# Altium PCB Afrodite V10_Final_3K (2).PcbDoc
Units mil, origin at the board's own origin, x right, y up, seen from the top; angles counter-clockwise.
Board outline 2992.52 x 4047.48 mil, 2 copper layers (Top Layer, Bottom Layer); 43 components, 30 nets, 158 pads, 7 vias.
Unrouted connection lines stored in the file: 2.
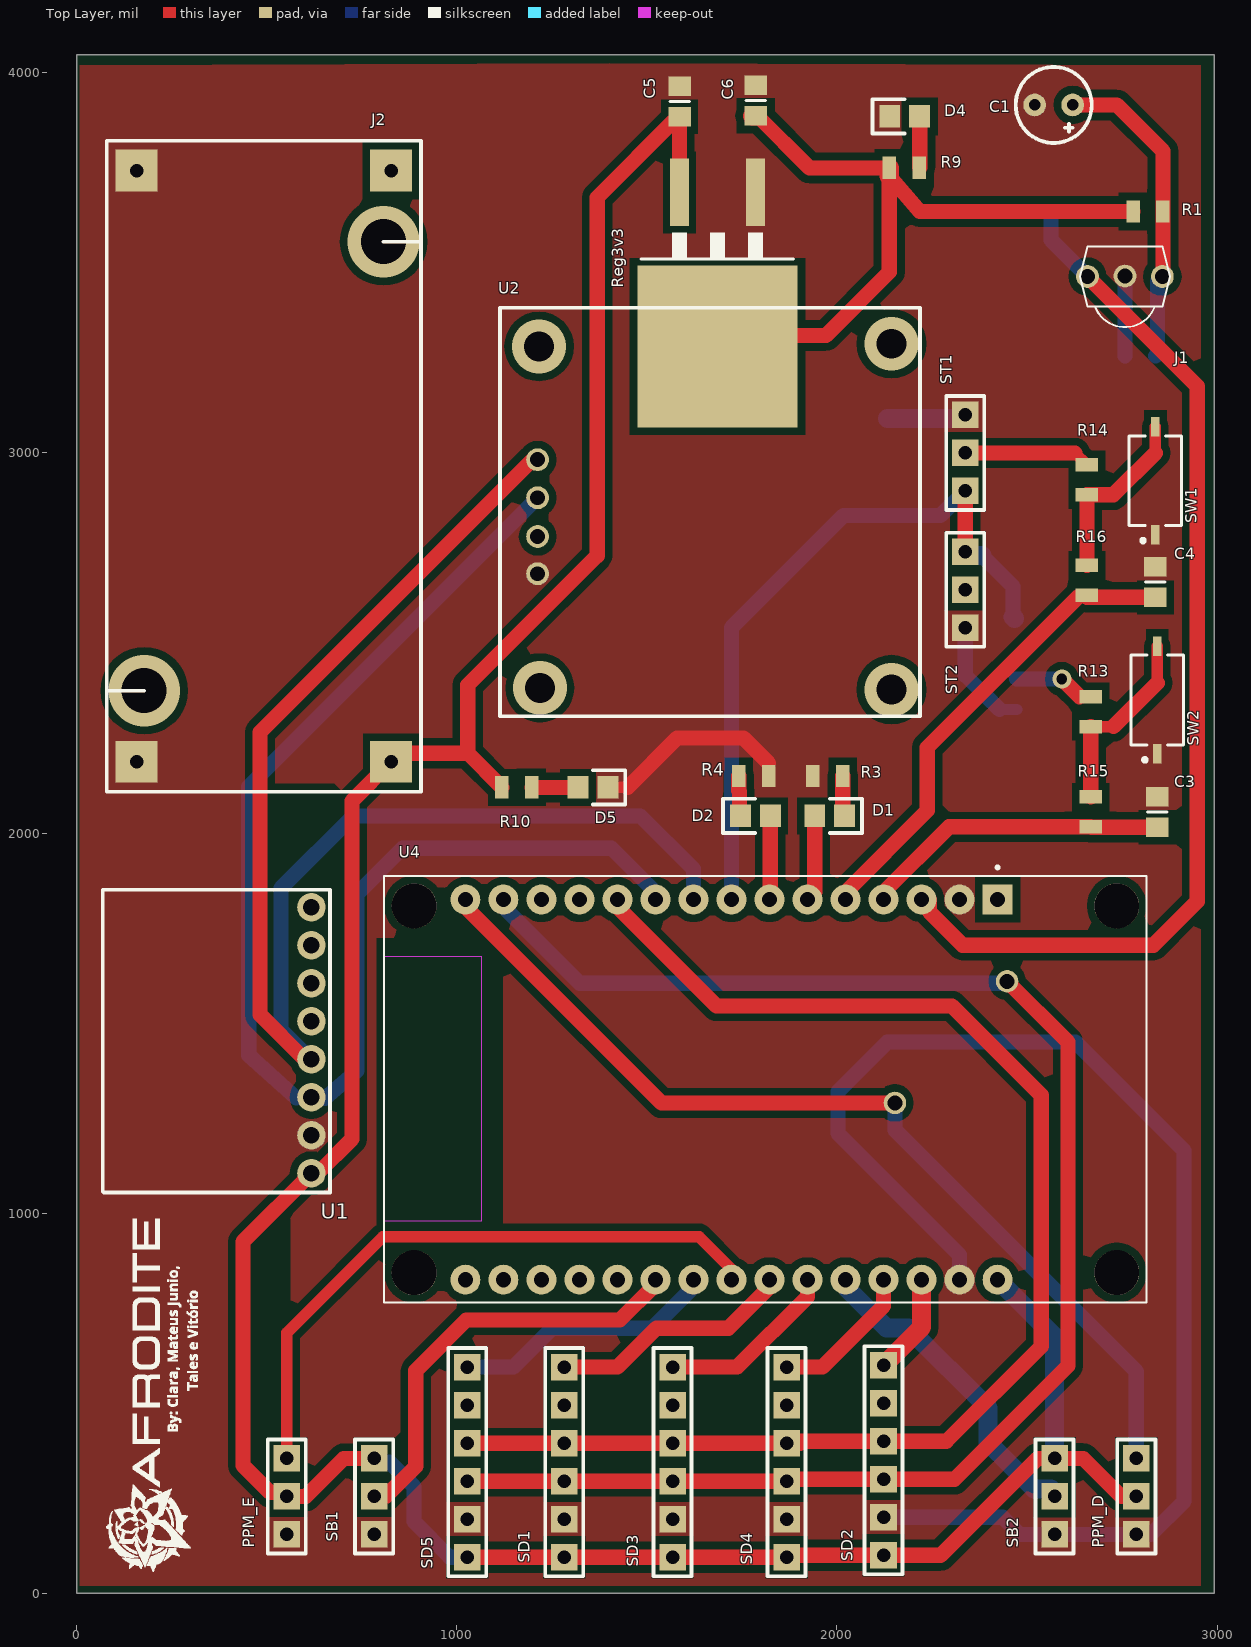
[diagram p0: Top Layer view]
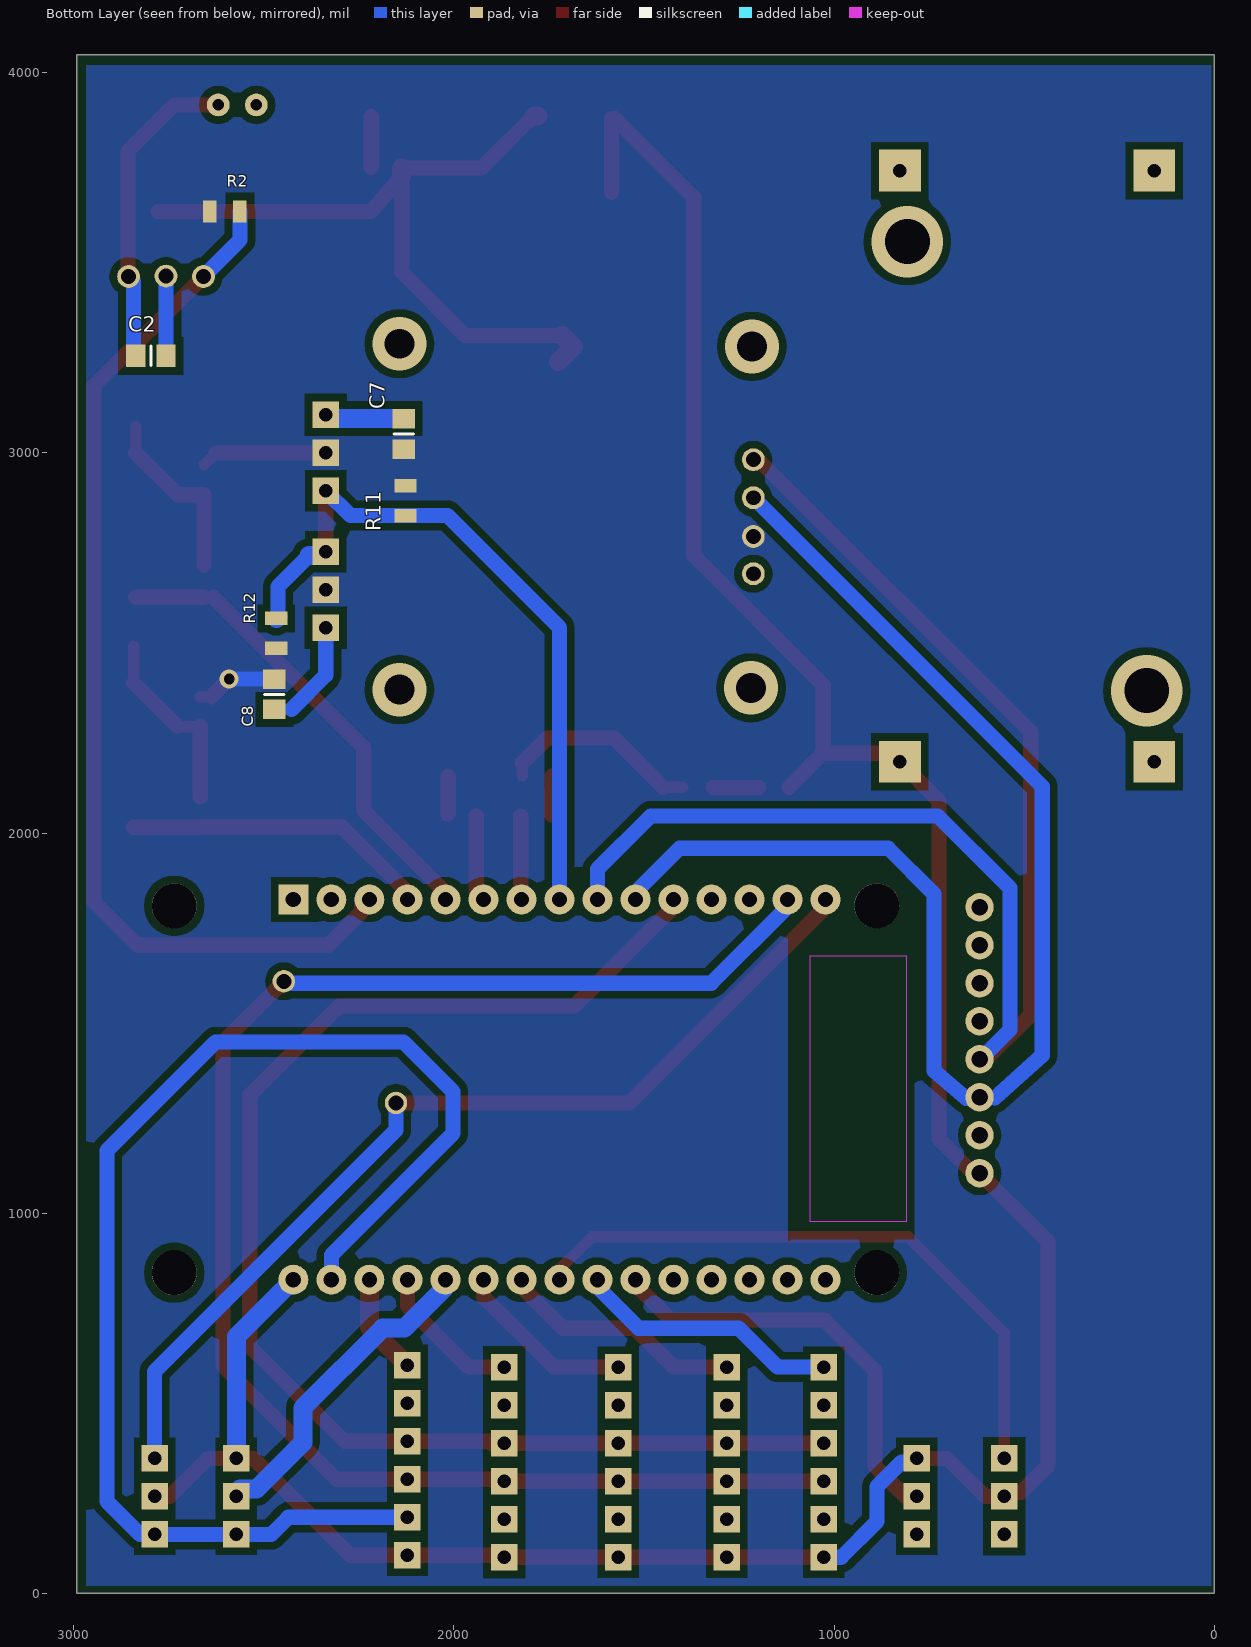
[diagram p1: Bottom Layer view, seen from below]

## Layer stack, top to bottom
Top Solder: solder mask 0.4, Solder Resist, Dk 3.5
Top Layer: signal copper 1.4
Dielectric 1: dielectric 12.6, FR-4, Dk 4.8
Bottom Layer: signal copper 1.4
Bottom Solder: solder mask 0.4, Solder Resist, Dk 3.5

## Board outline
0,0 0,4047.48 2992.52,4047.48 2992.52,0

## Design rules (kind name [scope] priority, off if disabled: settings)
Clearance [All] p1: gap=20 ignorepadtopadclearanceinfootprint=FALSE
PlaneConnect [All] p1: planeconnectstyle=Direct reliefexpansion=20 reliefentries=4 reliefconductorwidth=10 reliefairgap=10
PolygonConnect [All] p1: connectstyle=Direct reliefconductorwidth=10 reliefentries=4 polygonreliefangle="90 Angle" airgapwidth=10
RoutingVias [All] p1: holewidth=28 width=50 viastyle="Through Hole" minholewidth=28 minwidth=50 maxholewidth=28 maxwidth=50
SolderMaskExpansion [All] p1: expansion=4
Width [All] p1: maxlimit=50 minlimit=20 preferedwidth=30
29 further rules are at their usual default settings.

## Components (designator, comment, footprint, x,y, rotation, side; value= is the part's Value field where it differs from the comment)
C1 "CAP" "CAP ELET .100" 2570.08,3915.35 r0 top
C2 "CAP" "CAP 0805" 2797.52,3255 r0 bottom
C3 "CAP" "CAP 0805" 2842.52,2055 r270 top
C4 "CAP" "CAP 0805" 2837.52,2660 r270 top
C5 "CAP" "CAP 0805" 1585.83,3924.41 r270 top
C6 "CAP" "CAP 0805" 1786.22,3926.77 r270 top
C7 "CAP" "CAP 0805" 2132.52,3050 r90 bottom
C8 "CAP" "CAP 0805" 2472.52,2365 r270 bottom
D1 "LED" "LED 0805" 1980.87,2045 r0 top
D2 "LED" "LED 0805" 1785.24,2045 r180 top
D4 "LED" "LED 0805" 2178.15,3885 r180 top
D5 "LED" "LED 0805" 1358.15,2120 r0 top
J1 "TSOP1838" TSOP18XX 2757.52,3465 r0 top
J2 "Component_1" PCB_LM2596 662.52,2725 r270 top
PPM_D "CONECTOR_3PIN" CON3 2787.52,155 r90 top
PPM_E "CONECTOR_3PIN" CON3 552.52,155 r90 top
R1 "RESISTOR" "RES 0805" 2818.15,3635 r180 top value=100
R2 "RESISTOR" "RES 0805" 2602.52,3635 r0 bottom value=20k
R3 "RESISTOR" "RES 0805" 1975.87,2150 r180 top value=10k
R4 "RESISTOR" "RES 0805" 1780.87,2150 r0 top value=10k
R9 "RESISTOR" "RES 0805" 2176.89,3749.53 r0 top value=10k
R10 "RESISTOR" "RES 0805" 1158.15,2120 r0 top value=10k
R11 "RESISTOR" "RES 0805" 2127.52,2874.37 r270 bottom value=10k
R12 "RESISTOR" "RES 0805" 2467.52,2525 r90 bottom value=10k
R13 "RESISTOR" "RES 0805" 2667.52,2319.37 r90 top value=10k
R14 "RESISTOR" "RES 0805" 2657.52,2929.37 r90 top value=10k
R15 "RESISTOR" "RES 0805" 2667.52,2055.63 r270 top value=100
R16 "RESISTOR" "RES 0805" 2657.52,2665 r270 top value=100
Reg3v3 "g108433" TO263-3 1685.83,3307.48 r180 top (schematic designator g108433)
SB1 "CONECTOR_3PIN" CON3 782.52,155 r90 top
SB2 "CONECTOR_3PIN" CON3 2572.52,155 r90 top
SD1 "CONECTOR_6PIN" CON6 1282.52,595 r270 top
SD2 "CONECTOR_6PIN" CON6 2122.52,600 r270 top
SD3 "CONECTOR_6PIN" CON6 1567.52,595 r270 top
SD4 "CONECTOR_6PIN" CON6 1867.52,595 r270 top
SD5 "CONECTOR_6PIN" CON6 1027.52,595 r270 top
ST1 "CONECTOR_3PIN" CON3 2337.52,3100 r270 top
ST2 "CONECTOR_3PIN" CON3 2337.52,2540 r90 top
SW1 "PushButtonSMD" PUSHBUTTON.SMD 2837.52,2926.73 r90 top
SW2 "PushButtonSMD" PUSHBUTTON.SMD 2842.52,2350 r90 top
U1 "Sensor giroscopio acelerometro" mpu6050 637.52,1105 r180 top value=MPU6050
U2 "Displat OLED 128x64" "Display OLED" 1118.52,2307 r90 top
U4 "ESP32-DEVKIT-V1" MODULE_ESP32_DEVKIT_V1 1811.69,1325 r270 top

## Footprints (in the part's own frame and the unit in brackets; to place one, negate y for a bottom-side part, rotate by r counter-clockwise, add the part's x,y. Pads: shape width x height; smd on the part's side, far side on the other; paste and mask are expansions set on the pad)
"CAP 0805" [mm] "0805"
  rect 1.3x1.5 smd: 1(-1.016,0) 2(1.016,0)
  silkscreen extent 0,-0.65 0,0.65, body extent -1.03,-0.61 0.97,0.59, height 0.88
"CAP ELET .100" [mil]
  round 60 hole 30: 1(-50,0) 2(50,0)
  silkscreen extent -100,-100 100,100, body extent -98,-99 98,98, height 453
CON3 [mil]
  rect 70x70 hole 35.43: 1(0,0) 2(100,0) 3(200,0)
  silkscreen extent -50,-50 250,50, body extent -39,-47 239,46, height 519
CON6 [mil]
  rect 70x70 hole 35.43: 1(0,0) 2(100,0) 3(200,0) 4(300,0) 5(400,0) 6(500,0)
  silkscreen extent -50,-50 550,50, body extent -50,-47 543,46, height 519
"Display OLED" [mil]
  round 60 hole 39.37: 1(375,-94) 2(473,-94) 3(575,-94) 4(675,-94)
  silkscreen extent 0,-1100 1075,5, body extent -265,-1098 1049,-1, height 426
"LED 0805" [mm] "0805"
  rect 1.4x1.5 smd: 1(-1,0) 2(1,0)
  silkscreen extent 0,-1.14 2.16,1.14, body extent -1.03,-0.4 1.03,0.51, height 0.85
MODULE_ESP32_DEVKIT_V1 [mm]
  rect 2x2 hole 1.02: 1(-12.7,15.515)
  round 2 hole 1.02: 2(-12.7,12.975) 3(-12.7,10.435) 4(-12.7,7.895) 5(-12.7,5.355) 6(-12.7,2.815) 7(-12.7,0.275) 8(-12.7,-2.265) 9(-12.7,-4.805) 10(-12.7,-7.345) 11(-12.7,-9.885) 12(-12.7,-12.425) 13(-12.7,-14.965) 14(-12.7,-17.505) 15(-12.7,-20.045) 16(12.7,-20.045) 17(12.7,-17.505) 18(12.7,-14.965) 19(12.7,-12.425) 20(12.7,-9.885) 21(12.7,-7.345) 22(12.7,-4.805) 23(12.7,-2.265) 24(12.7,0.275) 25(12.7,2.815) 26(12.7,5.355) 27(12.7,7.895) 28(12.7,10.435) 29(12.7,12.975) 30(12.7,15.515)
  round 3 hole 3 unplated: ""(-12.28,23.475) ""(-12.28,-23.475) ""(12.23,23.475) ""(12.23,-23.475)
  Keep-Out Layer region: 8.78,-25.475 -8.91,-25.475 -8.91,-18.985 8.78,-18.985
  Keep-Out Layer region: 8.78,-25.475 -8.91,-25.475 -8.91,-18.985 8.78,-18.985
  silkscreen extent -14.95,-25.47 14.23,25.47, body extent -14.22,-25.53 14.28,25.4, height 7.24
mpu6050 [mm]
  round 1.9 hole 1.1: 1(0.508,0) 2(0.508,-2.54) 3(0.508,-5.08) 4(0.508,-7.62) 5(0.508,-10.16) 6(0.508,-12.7) 7(0.508,-15.24) 8(0.508,-17.78)
  silkscreen extent -0.74,-18.95 14.45,1.3, body extent -3.86,-19.02 14.5,1.3, height 36.48
PCB_LM2596 [mm]
  rect 2.8x2.8 hole 0.9: 1(-25.846,4.182) 2(-25.846,-12.818) 3(13.654,4.182) 4(13.654,-12.818)
  silkscreen extent -27.85,-14.82 15.65,6.18, body extent -27.85,-14.82 15.65,6.18, height 13.02
PUSHBUTTON.SMD [mm] "SODFL, 2-Leads, Body 3,40x7,98mm, IPC Medium Density"
  rect 1.3x0.55 smd: 1(-3.6,0) 2(3.6,0)
  silkscreen extent -4.12,-1.75 3,1.75, body extent -3,-1.75 3,1.75, height 2
"RES 0805" [mm] "0805 (1/8W)"
  rect 0.9x1.5 smd: 1(-1,0) 2(1,0)
  body extent -1.02,-0.62 0.95,0.6, height 0.48
TO263-3 [mm]
  rect 1.25x4.5 smd: 1(-2.54,-9.6) 3(2.54,-9.6)
  rect 10.7x10.8 smd: 2(0,0.7)
  silkscreen extent -5.08,-6.88 5.11,-5.15, body extent -5.16,-9.53 4.9,5.71, height 4.84
TSOP18XX [mil]
  round 60 hole 39.37: 1(98.38,-1.05) 2(-98.47,-1.05) 3(0,0)
  silkscreen extent -118,-134 118,78, body extent -143,-143 146,50, height 706

## Part data
C1: library part "CAP. ELETROLÍTICO", "Capacitor", Valor=10nF
C2 C3 C4 C5 C6 C7 C8: library part "CAP. CERÂMICO", "Capacitor", Criado em=26/06/2012, Criador por="Luigi Eduardo", Pertence a=Trincabotz
  C2: Valor=100uF
  C3 C4 C5 C6 C7 C8: Valor=100nF
J1: "IR Receiver and Demodulator", Package=None, Availability=Unavailable, MP=TSOP1838, Price=None
R1 R2 R3 R4 R9 R10 R11 R12 R13 R14 R15 R16: "Resistor"
U1: library part mpu6050, "Sera usado na afrodite"
U2: library part "Display OLED"
U4: "Dual core, Wi-Fi: 2.4 GHz up to 150 Mbits/s,BLE (Bluetooth Low Energy) and legacy Bluetooth, 32 bits, Up to 240 MHz", Package=None, Availability=Unavailable, MP=ESP32-DEVKIT-V1, Price=None

## Free pads (board coordinates)
  round 59.06 hole 39.37: 9(2152.52,1290) 15(2447.52,1610)

## Via types
v1: diameter 141.73, hole 78.74, Top Layer to Bottom Layer, 4 vias
v2: diameter 188.98, hole 118.11, Top Layer to Bottom Layer, 2 vias
v3: diameter 50, hole 28, Top Layer to Bottom Layer, 1 vias

## Nets (pads, with @x,y where several pads share a name; then routed paths per layer and width w, separated by ;. In a path a pad name is that pad's centre, name@x,y a point inside that pad or via, vN(x,y) a via of type N, cw(c..) or ccw(c..) an arc to the next point about the centre after c; other vN are vias at no path point)
3V3: C6.2 C7.1 C8.1 R1.2 R2.2 R9.1 R11.1 R12.1 R13.2 R14.2 Reg3v3.2 ST1.2 ST2.2 U2.2 | length 2505.5
  Top Layer w30: 2626.26,3000 R14.2 ; 2637.78,2358.74 R13.2
  Top Layer w40: Reg3v3.2@1714.96,3309.06 1970.87,3309.06 2137.52,3475.71 2137.52,3728.82 2217.52,3635 R1.2 ; C6.2@1790.16,3886.77 1927.4,3749.53 R9.1 ; ST1.2 2626.26,3000 ; v3(2591.52,2405) 2637.78,2358.74
  Top Layer w50: Reg3v3.2@1714.96,3309.06 Reg3v3.2 Reg3v3.2@1724.8,3240.94 ; C6.2@1778.35,3886.77 C6.2@1782.28,3886.77 ; C6.2 C6.2@1790.16,3886.77 ; R9.1@2137.52,3728.82 R9.1
  Bottom Layer w40: C8.1 v3(2591.52,2405)
5V: C5.2 J2.3 PPM_D.2 PPM_E.2 R10.1 Reg3v3.3 SB1.3 SB2.3 SD1.6 SD2.6 SD3.6 SD4.6 SD5.6 U1.1 U4.30 | length 7727.4
  Top Layer w40: SB1.3 702.52,355 602.52,255 PPM_E.2 542.52,265 508.88,265 437.52,336.36 437.52,925 U1.1 634.05,1105 724.35,1195.3 724.35,2084.63 J2.3 849.72,2210 1028.78,2210 ; SD5.6 SD1.6 SD3.6 SD4.6 1872.52,100 SD2.6 2272.52,100 2527.52,355 SB2.3 2647.76,355 2747.76,255 PPM_D.2 ; R10.1 1028.78,2210 ; Reg3v3.3 1585.83,3879.29 1576.77,3879.29 1369.29,3671.81 1369.29,2729.57 1028.78,2389.06 1028.78,2210
  Bottom Layer w40: SB1.3 792.52,345 823.11,345 887.52,280.59 887.52,188.86 981.38,95 SD5.6
  Bottom Layer w50: U4.30 2572.52,675 SB2.3
DOWN: C4.2 R16.2 U4.5 | length 1258.3
  Top Layer w30: U4.5 U4.5@2022.52,1844 ; R16.2@2632.52,2620 2657.52,2620 R16.2
  Top Layer w40: U4.5@2022.52,1844 2237.52,2059 2237.52,2225 R16.2@2632.52,2620 ; R16.2@2657.52,2620 C4.2
GND: C1.1 C2.1 C3.1 C4.1 C5.1 C6.1 C7.2 C8.2 D4.2 D5.2 J1.3 J2.2 J2.4 PPM_D.1 PPM_E.1 R3.2 R4.2 Reg3v3.1 SB1.1 SB2.1 SD1.5 SD2.5 SD3.5 SD4.5 SD5.5 ST1.1 ST2.1 SW1.1 SW2.1 U1.2 U2.1 U4.2 U4.29 | length 4730.9
  Top Layer w30: D5.2 1449.52,2120 ; R4.2 1820.24,2183.7
  Top Layer w40: 1449.52,2120 1579.13,2249.61 1754.33,2249.61 1820.24,2183.7
  Bottom Layer w30: 2427.52,2325 C8.2
  Bottom Layer w40: SD2.5 2435.83,200 2480.83,155 SB2.1 PPM_D.1 2825.52,155 2912.52,242 2912.52,1165 2627.52,1450 2132.52,1450 2002.52,1320 2002.52,1210 2322.52,890 U4.29 ; ST2.1 2337.52,2415 2427.52,2325 ; C2.1 J1.3
  Bottom Layer w50: C7.2 2327.52,3090 ST1.1
LED_D1: D1.1 U4.6 | length 227.9
  Top Layer w30: U4.6 U4.6@1941.5,1843.98
  Top Layer w40: U4.6@1941.5,1843.98 D1.1
LED_D2: D2.1 U4.7 | length 220.9
  Top Layer w30: U4.7 U4.7@1824.61,1827.09
  Top Layer w40: U4.7@1824.61,1827.09 D2.1
NetC1_2: C1.2 C2.2 J1.1 R1.1 | length 835
  Top Layer w30: J1.1 J1.1@2857.52,3465.57
  Top Layer w40: C1.2 2736.22,3915.35 2857.52,3794.06 R1.1 J1.1@2857.52,3465.57
  Bottom Layer w40: C2.2 2843.31,3260.79 2843.31,3451.36 J1.1
NetD1_2: D1.2 R3.1 | length 107.1
  Top Layer w30: D1.2@2015.24,2050 D1.2
  Top Layer w40: D1.2@2015.24,2050 R3.1
NetD2_2: D2.2 R4.1 | length 106.8
  Top Layer w30: 1741.5,2111.81 1743.68,2109.63 ; D2.2@1743.68,2047.19 D2.2
  Top Layer w40: 1741.5,2111.81 R4.1 ; D2.2@1743.68,2047.19 1743.68,2109.63
NetD4_1: D4.1 R9.2 | length 136
  Top Layer w30: R9.2 R9.2@2217.52,3750.79
  Top Layer w40: R9.2@2217.52,3750.79 D4.1
NetD5_1: D5.1 R10.2 | length 121.3
  Top Layer w40: R10.2 D5.1
NetR13_1: R13.1 R15.1 SW2.2 | length 504.4
  Top Layer w30: R13.1 2727.52,2280 ; 2842.52,2395 SW2.2
  Top Layer w40: R15.1 R13.1 ; 2727.52,2280 2842.52,2395
NetR14_1: R14.1 R16.1 SW1.2 | length 479.7
  Top Layer w30: 2837.52,3000 SW1.2
  Top Layer w40: R16.1 R14.1 2727.52,2890 2837.52,3000
PPM_D: pad.9 PPM_D.3 U4.15 | length 2560.9
  Top Layer w40: U4.15 1022.52,1805.68 1538.2,1290 pad.9
  Bottom Layer w40: pad.9 2152.52,1218.35 2787.52,583.35 PPM_D.3
PPM_E: PPM_E.3 U4.23 | length 1667.4
  Top Layer w30: PPM_E.3 552.52,685 805.08,937.56 1637.52,937.56 1722.52,852.56 U4.23
SB1: SB1.2 U4.21 | length 1130.8
  Top Layer w40: SB1.2 812.87,255 892.13,334.25 892.13,586.17 1024.85,718.9 1428.66,718.9 1522.52,812.75 U4.21
SB2: SB2.2 U4.26 | length 856.9
  Bottom Layer w50: U4.26 2028.02,819.5 2028.02,800.18 2130.44,697.76 2187.67,697.76 2397.64,487.8 2397.64,396.24 2518.88,275 2562.52,275 2562.52,265 SB2.2
SCL: pad.15 SD1.4 SD2.4 SD3.4 SD4.4 SD5.4 U4.14 | length 4212.9
  Top Layer w40: SD5.4 SD1.4 SD3.4 SD4.4 1872.52,300 SD2.4 2308.88,300 2607.52,598.64 2607.52,1450 pad.15
  Bottom Layer w40: U4.14 1122.52,1805.68 1323.2,1605 2442.52,1605 pad.15
SCL_AUX: U1.3 U2.3 U4.10 | length 3503.9
  Bottom Layer w40: U2.3 452.52,2122 452.52,1415.2 577.35,1302.88 U1.3 653.46,1302.34 737.52,1374.82 737.52,1840 857.52,1960 1406.84,1960 1522.52,1844.32 U4.10
SDA: SD1.3 SD2.3 SD3.3 SD4.3 SD5.3 U4.11 | length 3615.3
  Top Layer w40: SD5.3 SD1.3 SD3.3 SD4.3 1902.52,395 1907.52,400 SD2.3 2287.52,400 2537.52,650 2537.52,1310 2302.52,1545 1683.2,1545 1422.52,1805.68 U4.11
SDA_AUX: U1.4 U2.4 U4.9 | length 3739.6
  Top Layer w40: U1.4 599.72,1405 482.52,1522.2 482.52,2265 1199.52,2982 U2.4
  Bottom Layer w40: U1.4 615.13,1405 537.52,1482.61 537.52,1855 727.52,2045 1482.52,2045 1622.52,1905 U4.9
SEN_TEMP: R11.2 R12.2 ST1.3 ST2.3 U4.8 | length 1888.4
  Top Layer w40: ST2.3 ST1.3
  Bottom Layer w40: U4.8 1722.52,2540.24 2017.28,2835 R11.2 2272.52,2835 ST1.3 ; 2381.16,2730 2462.99,2648.17 R12.2@2462.99,2568.9
  Bottom Layer w50: ST2.3 2347.52,2730 2381.16,2730 ; R12.2@2462.99,2568.9 R12.2
SINAL_RECEP: J1.2 R2.1 U4.3 | length 2815.8
  Top Layer w40: U4.3 2243.15,1825 2243.15,1792.12 2330.27,1705 2832.52,1705 2947.52,1820 2947.52,3175.48 J1.2
  Bottom Layer w40: R2.1 2563.15,3559.85 J1.2
UP: C3.2 R15.2 U4.4 | length 811.1
  Top Layer w40: U4.4 2122.52,1844.32 2294.46,2016.26 R15.2 2668.78,2015 C3.2
VBAT: J2.1
XSHUT1: SD1.1 U4.24 | length 646.6
  Top Layer w40: SD1.1 1422.52,595 1525.05,697.53 1714.36,697.53 1822.52,805.68 U4.24
XSHUT2: SD2.1 U4.28 | length 266.4
  Top Layer w50: SD2.1 2222.52,700 U4.28
XSHUT3: SD3.1 U4.25 | length 476.6
  Top Layer w40: SD3.1 1737.52,595 1922.52,780 U4.25
XSHUT4: SD4.1 U4.27 | length 390.7
  Top Layer w40: SD4.1 1961.54,595 2122.52,755.98 U4.27
XSHUT5: SD5.1 U4.22 | length 701.6
  Bottom Layer w40: SD5.1 1148.88,595 1251.41,697.53 1514.36,697.53 1622.52,805.68 U4.22
pads on no net: SD1.2 SD2.2 SD3.2 SD4.2 SD5.2 U1.5 U1.6 U1.7 U1.8 U4. U4.1 U4.12 U4.13 U4.16 U4.17 U4.18 U4.19 U4.20
copper on no net:
  other v1: 2143.52,2377 1218.52,2382 1216.52,3280 2143.52,3287
  other v2: 177.56,2374.45 807.48,3555.55

## Polygon pours and split planes (outlines as drawn)
GND on Top Layer "GND" (solid, pour order 20): 7.52,4020 7.52,20 2957.52,20 2957.52,4020 1402.52,4025
3V3 on Bottom Layer "3V3" (solid, pour order 22): 7.52,4020 7.52,20 2967.52,20 2967.52,4020

## Other copper
Top Layer:
  pour cut-out: 576.58,1564.06 567.38,1554.86 567.38,1530.6 555.3,1518.51 551.77,1522.05 533.86,1522.05 513.78,1542.13 513.78,2131.5 677.48,2131.5 699.39,2109.59 690.25,2100.45 690.25,1844.58 679.53,1833.86 679.44,1833.95 659.48,1833.95 632.5,1860.92 617.52,1845.94 576.58,1845.94 576.58,1821.96 559.62,1805 576.58,1788.04 576.58,1743.15 561.6,1728.16 561.6,1679.05 576.58,1664.06 576.58,1643.15 559.62,1626.19 559.62,1581.02 576.58,1564.06 567.38,1554.86 567.38,1533.95 559.61,1533.95 540.78,1515.13
  pour cut-out: 1513.39,3604.72
  pour cut-out: 1481.1,3680.71
  pour cut-out: 496.37,410.3 482.91,423.76 482.91,907.32 561.42,985.83 562.6,984.65 562.6,745 518.42,700.83 518.42,412.92 515.8,410.3
  pour cut-out: 788.35,1675.79 788.35,1724.17 787.52,1725 1122.52,1725 1122.52,925 1117.52,930 787.52,930
  region net GND: 2837.52,2330
  region net 3V3: 2829.78,2845.65
Bottom Layer:
  pour cut-out: 1435.02,2009.7 1467.9,2009.7 1585.86,1891.73 1585.86,1871.84 1581.21,1867.18 1544.63,1867.18 1418.57,1993.24
  pour cut-out: 1108.27,1948.43 1108.27,1858.66 1411.81,1858.66 1427.56,1874.41 1395.28,1906.69 1395.28,1937.8
  pour cut-out: 888.98,2020.47 828.74,1960.24 820.08,1960.24 712.99,1853.15 712.99,1424.8 695.28,1407.09 692.91,1409.45 642.52,1409.45 599.61,1452.36 599.61,1885.43 738.58,2024.41
  pour cut-out: 789.9,1683.59
  pour cut-out: 788.35,1675.79 719.69,1909.06 1122.52,1929.53 1122.52,930 1117.52,925 1112.52,930 787.52,930
  pour cut-out: 782.52,1675
  pour cut-out: 789.9,1683.59
  pour cut-out: 794.32,1690.21

## Silkscreen, mask and mechanical layers (free items; w line width, h text height)
Top Overlay:
  drawing of 2886 lines, arcs and shapes, not listed
Mechanical 1:
  the board outline again, w10